# Altium PCB PCBproyecto.PcbDoc
Units mm, origin at the board's own origin, x right, y up, seen from the top; angles counter-clockwise.
Board outline 85 x 75 mm, 2 copper layers (Top Layer, Bottom Layer); 40 components, 30 nets, 126 pads, 1 vias.
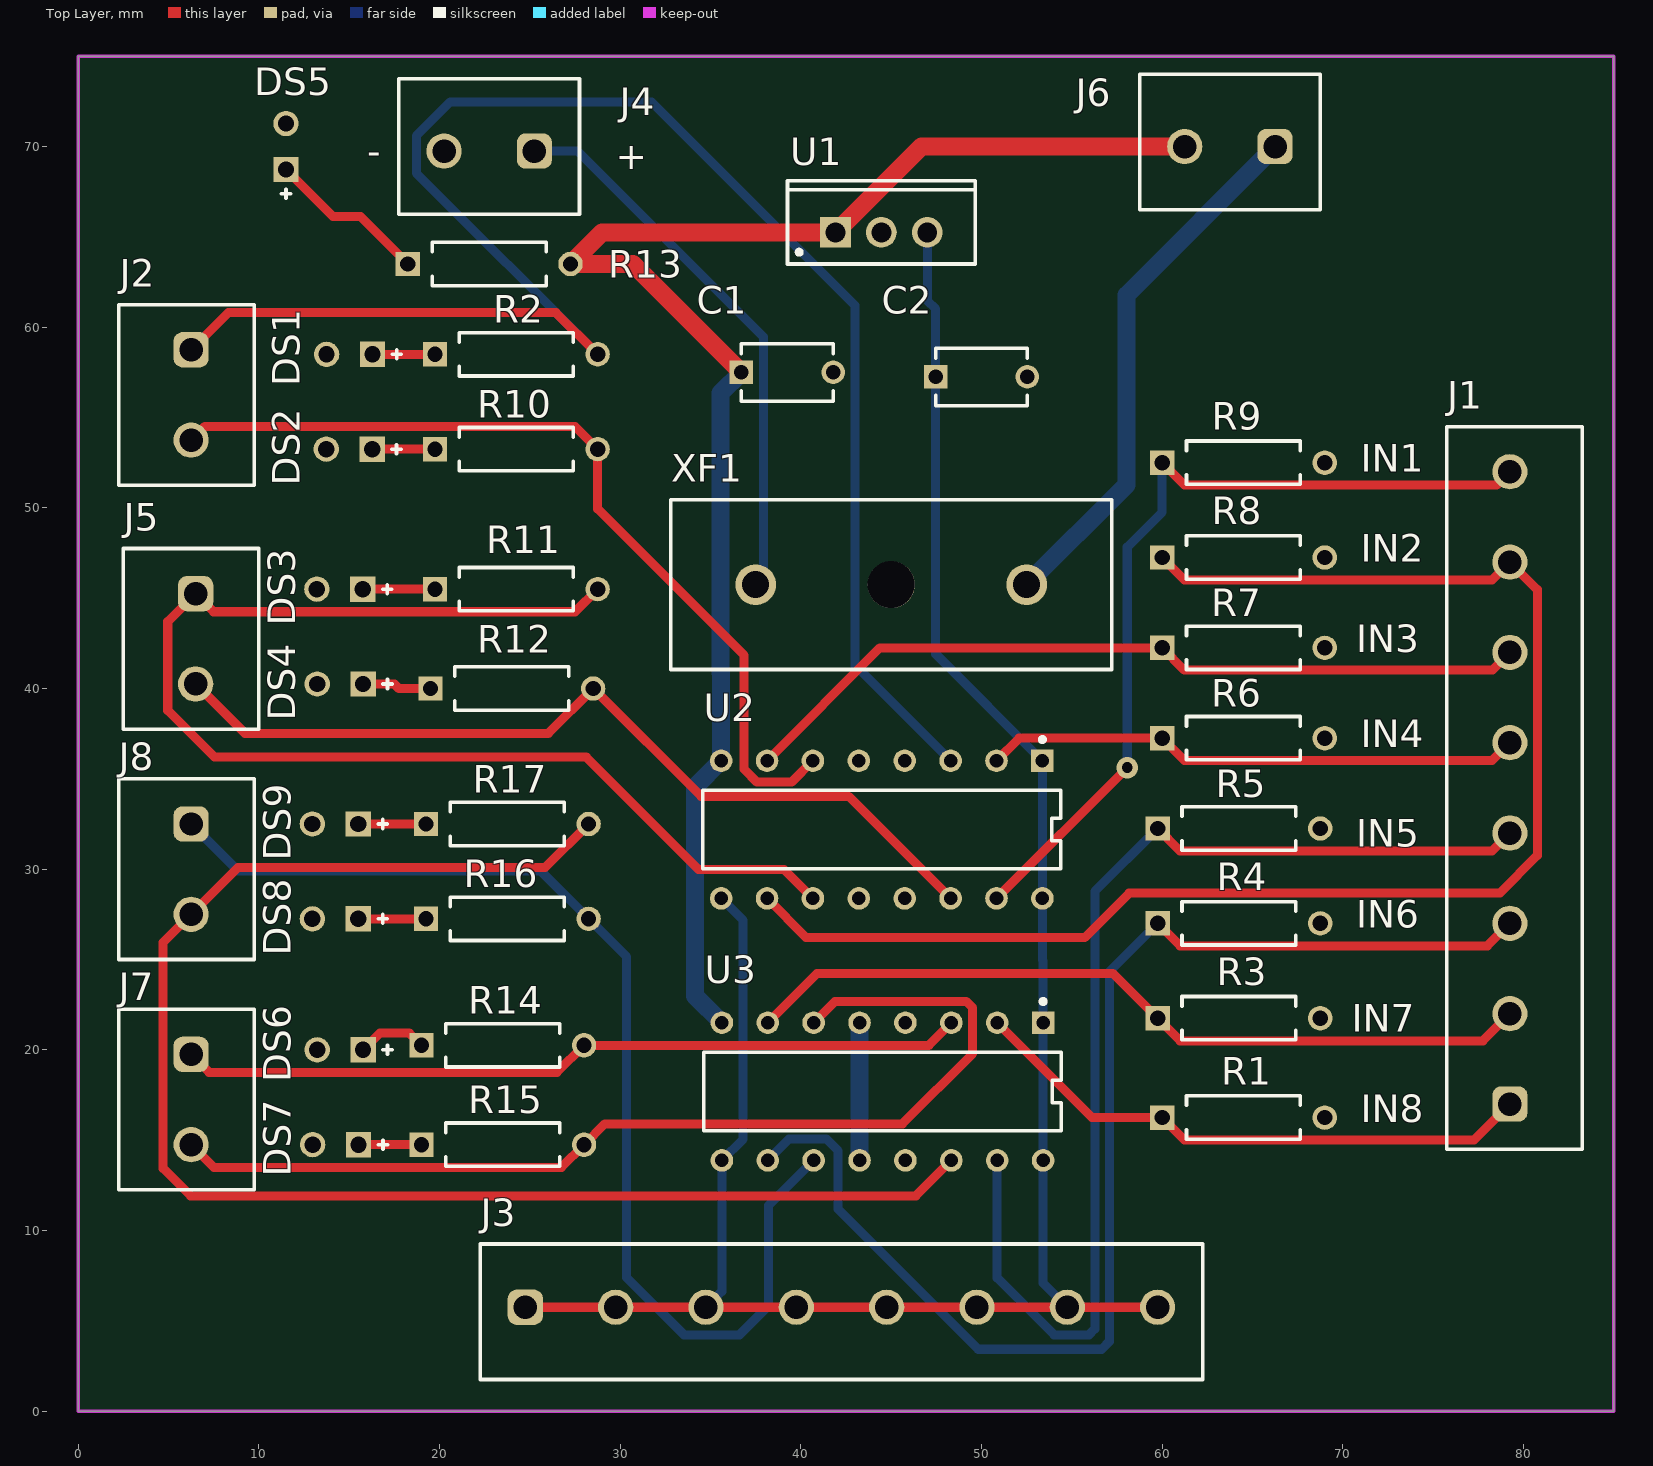
[diagram p0: Top Layer view]
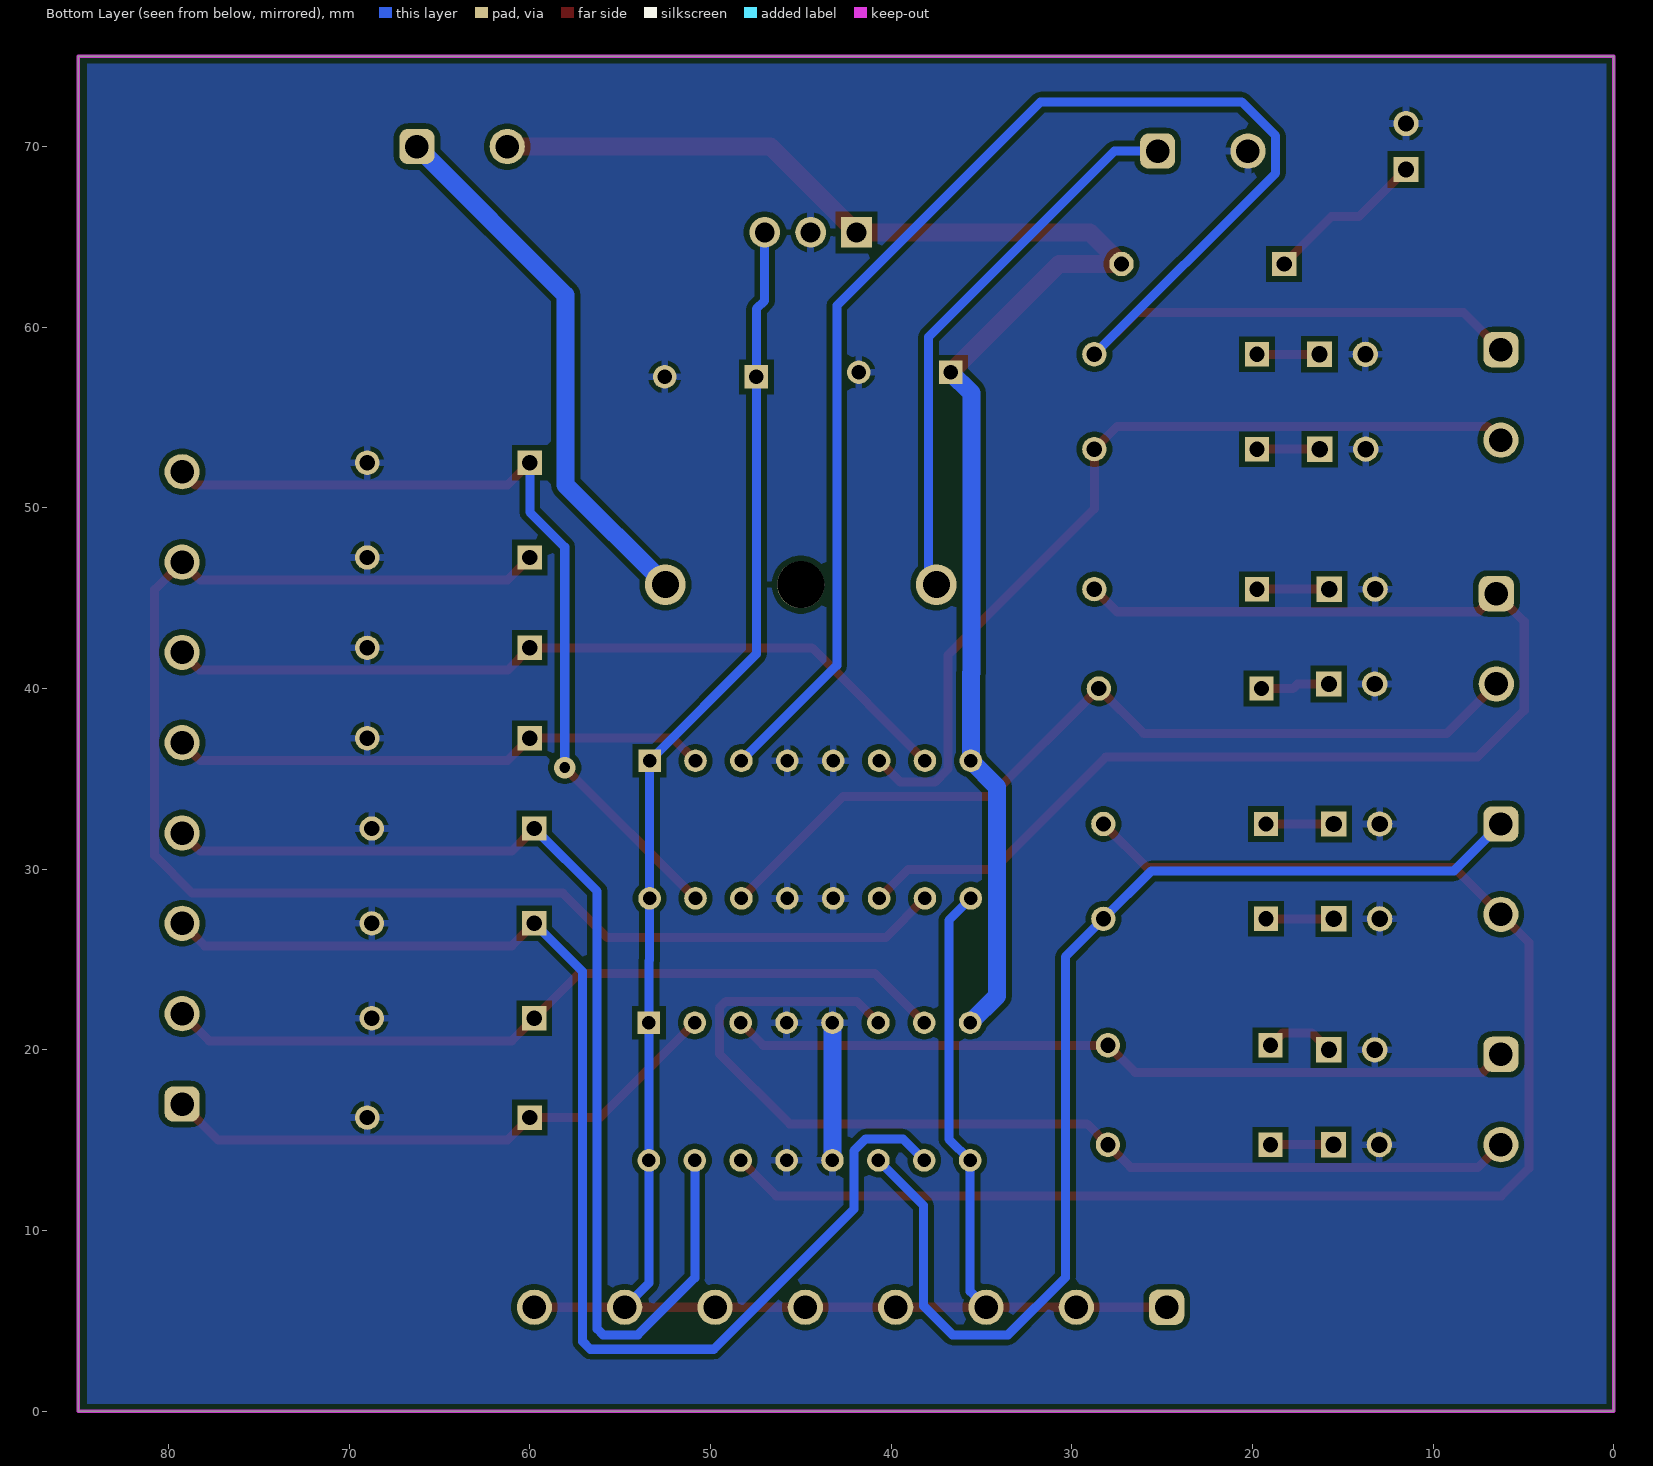
[diagram p1: Bottom Layer view, seen from below]

## Layer stack, top to bottom
Top Solder: solder mask 0.0102, Solder Resist, Dk 3.5
Top Layer: signal copper 0.0356
Dielectric 1: dielectric 0.32, FR-4, Dk 4.8
Bottom Layer: signal copper 0.0356
Bottom Solder: solder mask 0.0102, Solder Resist, Dk 3.5

## Board outline
0,0 0,75 85,75 85,0

## Design rules (kind name [scope] priority, off if disabled: settings)
Clearance [All] p1: gap=0.3 ignorepadtopadclearanceinfootprint=FALSE
HoleSize [All] p1: absolutevalues=TRUE maxlimit=3.5 minlimit=0.06 maxpercent=80.000 minpercent=20.000
PolygonConnect [All] p1: connectstyle=Relief reliefconductorwidth=0.4 reliefentries=4 polygonreliefangle="90 Angle" airgapwidth=0.254
RoutingVias [All] p1: holewidth=0.6 width=1.2 viastyle="Through Hole" minholewidth=0.4 minwidth=1 maxholewidth=0.6 maxwidth=1.2
SolderMaskExpansion [All] p1: expansion=0 istentingtop=FALSE
SupplyNets "Schematic Supply Nets_6" [InNet('+12')] p1: voltage=0.000
SupplyNets "Schematic Supply Nets_5" [InNet('+12V_IN')] p2: voltage=0.000
SupplyNets "Schematic Supply Nets_4" [InNet('+5')] p3: voltage=0.000
SupplyNets "Schematic Supply Nets" [InNet('GND')] p4: voltage=0.000
Width Potencia [InNetClass('Potencia')] p1: maxlimit=2 minlimit=0.8 preferedwidth=1
Width General [All] p2: maxlimit=1 minlimit=0.3 preferedwidth=0.5
Width [All] p3: maxlimit=0.254 minlimit=0.254 preferedwidth=0.254
29 further rules are at their usual default settings.

## Classes and differential pairs
net class Potencia: +12 +12V_IN GND

## Components (designator, comment, footprint, x,y, rotation, side; value= is the part's Value field where it differs from the comment)
C1 "C322C104K5R5TA" FP-C322C104K5R5TA-MFG 39.25,57.5 r0 top
C2 "C322C104K5R5TA" FP-C322C104K5R5TA-MFG 50,57.25 r0 top
DS1 "LTL-1CHG" LTST-LTL-1CHG-2 15.02,58.5 r180 top
DS2 "LTL-1CHG" LTST-LTL-1CHG-2 15,53.25 r180 top
DS3 "LTL-1CHG" LTST-LTL-1CHG-2 14.48,45.5 r180 top
DS4 "LTL-1CHG" LTST-LTL-1CHG-2 14.5,40.25 r180 top
DS5 "LTL-1CHG" LTST-LTL-1CHG-2 11.5,70 r90 top
DS6 "LTL-1CHG" LTST-LTL-1CHG-2 14.5,20 r180 top
DS7 "LTL-1CHG" LTST-LTL-1CHG-2 14.25,14.75 r180 top
DS8 "LTL-1CHG" LTST-LTL-1CHG-2 14.23,27.25 r180 top
DS9 "LTL-1CHG" LTST-LTL-1CHG-2 14.23,32.5 r180 top
J1 "691137710008" 691137710008 79.5,34.5 r90 top
J2 "691137710002" 691137710002 6,56.25 r270 top
J3 "691137710008" 691137710008 42.25,5.5 r0 top
J4 "691137710002" 691137710002 22.75,70 r180 top
J5 "691137710002" 691137710002 6.25,42.75 r270 top
J6 "691137710002" 691137710002 63.75,70.25 r180 top
J7 "691137710002" 691137710002 6,17.25 r270 top
J8 "691137710002" 691137710002 6,30 r270 top
R1 "MFR-25FBF52-100K" RESA60-630X240 64.5,16.25 r0 top value=10k
R2 "MFR-25FBF52-100K" RESA60-630X240 24.25,58.5 r0 top value=1k
R3 "MFR-25FBF52-100K" RESA60-630X240 64.25,21.75 r0 top value=10k
R4 "MFR-25FBF52-100K" RESA60-630X240 64.25,27 r0 top value=10k
R5 "MFR-25FBF52-100K" RESA60-630X240 64.25,32.25 r0 top value=10k
R6 "MFR-25FBF52-100K" RESA60-630X240 64.5,37.25 r0 top value=10k
R7 "MFR-25FBF52-100K" RESA60-630X240 64.5,42.25 r0 top value=10k
R8 "MFR-25FBF52-100K" RESA60-630X240 64.5,47.25 r0 top value=10k
R9 "MFR-25FBF52-100K" RESA60-630X240 64.5,52.5 r0 top value=10k
R10 "MFR-25FBF52-100K" RESA60-630X240 24.25,53.25 r0 top value=1k
R11 "MFR-25FBF52-100K" RESA60-630X240 24.25,45.5 r0 top value=1k
R12 "MFR-25FBF52-100K" RESA60-630X240 24,40 r0 top value=1k
R13 "MFR-25FBF52-100K" RESA60-630X240 22.75,63.5 r0 top value=1k
R14 "MFR-25FBF52-100K" RESA60-630X240 23.5,20.25 r0 top value=1k
R15 "MFR-25FBF52-100K" RESA60-630X240 23.5,14.75 r0 top value=1k
R16 "MFR-25FBF52-100K" RESA60-630X240 23.75,27.25 r0 top value=1k
R17 "MFR-25FBF52-100K" RESA60-630X240 23.75,32.5 r0 top value=1k
U1 "L7805CV" TO220 44.46,65.25 r0 top
U2 "L293DNE" FP-NE0016A-MFG 44.48,32.19 r270 top
U3 "L293DNE" FP-NE0016A-MFG 44.52,17.69 r270 top
XF1 "696105003002" 696105003002 45,45.75 r0 top

## Footprints (in the part's own frame and the unit in brackets; to place one, negate y for a bottom-side part, rotate by r counter-clockwise, add the part's x,y. Pads: shape width x height; smd on the part's side, far side on the other; paste and mask are expansions set on the pad)
691137710002 [mm] "Horizontal Cable Entry with Pressure Clamp, pitch 5mm, 02p"
  rrect50% 1.95x1.95 hole 1.3: 1(-2.5,0.25)
  round 1.95 hole 1.3: 2(2.5,0.25)
  silkscreen extent -5,-3.75 5,3.75, body extent -5,-3.75 5,3.75, height 11.6
691137710008 [mm] "Horizontal Cable Entry with Pressure Clamp, pitch 5mm, 08p"
  rrect50% 1.95x1.95 hole 1.3: 1(-17.5,0.25)
  round 1.95 hole 1.3: 2(-12.5,0.25) 3(-7.5,0.25) 4(-2.5,0.25) 5(2.5,0.25) 6(7.5,0.25) 7(12.5,0.25) 8(17.5,0.25)
  silkscreen extent -20,-3.75 20,3.75, body extent -20,-3.75 20,3.75, height 11.6
696105003002 [mm] "FUSEHOLDER BLOCKS - PCB - CLIP COVER - THT"
  round 2.25 hole 1.5: 1(-7.5,0) 2(7.5,0)
  round 2.6 hole 2.6 unplated: MH1(0,0)
  silkscreen extent -12.2,-4.7 12.2,4.7, body extent -12.2,-4.7 12.2,4.7, height 11.55
FP-C322C104K5R5TA-MFG [mm]
  rect 1.3x1.3 hole 0.8 paste-2539.97 mask+0: 1(-2.54,0)
  round 1.3 hole 0.8 paste-2539.97 mask+0: 2(2.54,0)
  silkscreen extent -2.54,-1.59 2.54,1.59, body extent -3.29,-1.69 3.29,1.69, height 0.25
FP-NE0016A-MFG [mm]
  rect 1.25x1.25 hole 0.75 paste-2539.97 mask+0: 1(-3.81,8.89)
  round 1.25 hole 0.75 paste-2539.97 mask+0: 2(-3.81,6.35) 3(-3.81,3.81) 4(-3.81,1.27) 5(-3.81,-1.27) 6(-3.81,-3.81) 7(-3.81,-6.35) 8(-3.81,-8.89) 9(3.81,-8.89) 10(3.81,-6.35) 11(3.81,-3.81) 12(3.81,-1.27) 13(3.81,1.27) 14(3.81,3.81) 15(3.81,6.35) 16(3.81,8.89)
  silkscreen extent -5.11,-9.9 2.18,9.9
LTST-LTL-1CHG-2 [mm] "TH, 2-Leads, Dia 3.8mm"
  rect 1.4x1.4 hole 0.9: 1(-1.27,0)
  round 1.4 hole 0.9: 2(1.27,0)
  silkscreen extent -2.87,-0.25 -2.37,0.25, body extent -1.9,-1.9 1.9,1.9, height 6.5
RESA60-630X240 [mm] "Axial Resistor, 2-Leads, Dia 2.4mm, Body Length 6.3mm"
  rect 1.35x1.35 hole 0.85: 1(-4.5,0)
  round 1.35 hole 0.85: 2(4.5,0)
  silkscreen extent -3.15,-1.2 3.15,1.2, body extent -4.78,-1.2 4.78,1.2, height 2.4
TO220 [mm] "TO, Thru-Hole, Vertical, Heatsink Mounted; 3 In-Line Leads; Pitch 2.54 mm"
  rect 1.7x1.7 hole 1.1: 1(-2.54,0)
  round 1.7 hole 1.1: 2(0,0) 3(2.54,0)
  silkscreen extent -5.2,-1.75 5.2,2.85, body extent -5.25,-1.8 5.25,2.9, height 19.7

## Part data
C1 C2: library part CMP-03020-034661-1, "CAP CER 0.1UF 50V X7R RADIAL", Capacitance=100nF, Case/Package=Radial, Dielectric=X7R, Dielectric Material=Ceramic, Max Operating Temperature=125°C, Min Operating Temperature=-55°C, Package Quantity=500, Tolerance=10%, Voltage=50V, Construction=RADIAL, Depth=3.18mm, Dissipation Factor=2.5%, Height=3.18mm, Height - Seated (Max)=0.26inch, Lead Diameter=0.51mm, Lead Free="Lead Free", Lead Length=7mm, Lead Pitch=5.08mm, Lead/Base Style="Formed Leads", Length=5.08mm, Material=Ceramic, Mount="Through Hole", Number of Pins=2, Packaging=Bulk, Radiation Hardening=No, REACH SVHC="No SVHC", RoHS Compliant=Yes, Series="Golden Max™", Termination=Radial, Voltage Rating=50V, Voltage Rating (DC)=50V, Weight=0.0625lb, Width=0.125inch
DS1 DS2 DS3 DS4 DS5 DS6 DS7 DS8 DS9: library part CMP-007-00019-2, "LED Uni-Color Green, 100 mW, 30 mA, -55 to 100 degC, 2-Pin THD, RoHS, Bulk", Case/Package=Radial, Colour=Green, Forward Current=30mA, Forward Voltage=2.6V, Manufacturer=Lite-On, Max Operating Temperature=100°C, Min Operating Temperature=-55°C, Package Description="2-Pin Through Hole Device, Dia 3.8 mm", Package Quantity=1000, Power=100mW, Datasheet URL=http://datasheet.octopart.com/LTL-1CHG-Lite-On-datasheet-143841.pdf, Datasheet Version=Mar-00, Illumination Colour=Green, Lens Style=Dome, Luminous Intensity=12.6mcd, Manufacturer URL=http://www.us.liteon.com/, Mounting Technology=TH, Nominal Vf=2.1V, Package Reference=LTL-1CHG, Packaging=Bulk, Pins=2, RoHS Compliant=True, Viewing Angle=60degrees
J1 J3: library part CMP-1502-03330-3, "Terminal Block, 5MM Pitch, Horizontal, Pressure Clamp Glow Wire, Pcb, 8PINS, Gr", Current Rating=16A, Max Operating Temperature=110°C, Min Operating Temperature=-30°C, Voltage Rating=300V, Contact Material=Tin, Height=11.6mm, Lead Pitch=5mm, Number of Contacts=8, Number of Pins=8, Number of Rows=1, Packaging=Box, RoHS=Compliant
J2 J4 J5 J6 J7 J8: library part CMP-1502-03324-3, "Terminal Block, 5MM Pitch, Horizontal, Pressure Clamp Glow Wire, Pcb, 2PINS, Gr", Current Rating=16A, Max Operating Temperature=120°C, Min Operating Temperature=-30°C, Voltage Rating=300V, Contact Material="Nickel, Tin", Height=11.6mm, Lead Pitch=5mm, Number of Contacts=2, Number of Pins=2, Number of Rows=1, Packaging=Box, RoHS=Compliant
R1 R2 R3 R4 R5 R6 R7 R8 R9 R10 R11 R12 R13 R14 R15 R16 R17: library part CMP-009-00045-4, "Axial Resistor, 100 KOhm, +/- 1%, 0.25 W, -55 to 155 degC, 2-Pin THD, RoHS, Bulk", Case/Package=Axial, Manufacturer=Yageo, Max Operating Temperature=155°C, Min Operating Temperature=-55°C, Package Description="2-Pin Axial Lead, Dia 2.4 mm, Body Length 6.3 mm", Package Quantity=200, Package Reference=MFR-25, Power=250mW, Tolerance=1%, Voltage Rating=250V, Datasheet URL=http://www.yageo.com/documents/recent/Yageo%20LR_MFR_2013.pdf, Datasheet Version=Apr-13, Manufacturer URL=http://www.yageo.com/, Mounting Technology=TH, Packaging=Bulk, RoHS Compliant=True
U1: library part CMP-0244-00483-1, "Positive Voltage Regulator, 5V, 3-Pin TO-220", ComponentLink1Description="Manufacturer URL", ComponentLink1URL=http://www.st.com, ComponentLink2Description=Datasheet, ComponentLink2URL=http://www.st.com/internet/com/TECHNICAL_RESOURCES/TECHNICAL_LITERATURE/DATASHEET/CD00000444.pdf, ComponentLink3Description="Package Specification", ComponentLink3URL=http://www.st.com/internet/com/TECHNICAL_RESOURCES/TECHNICAL_LITERATURE/PACKAGE_INFORMATION/CD00004649.pdf, DatasheetVersion=16/11/2011, PackageDescription="TO, Thru-Hole, Vertical, Heatsink Mounted; 3 In-Line Leads; Pitch 2.54 mm", PackageReference=TO220, PackageVersion=ver3.0
U2 U3: library part CMP-1685-00015-2, "IC MTR DRV BIPOLAR 4.5-36V 16DIP", Case/Package=PDIP, Max Operating Temperature=70°C, Max Supply Voltage=36V, Min Operating Temperature=0°C, Min Supply Voltage=4.5V, Operating Supply Current=24mA, Output Current=600mA, Package Quantity=25, Height=4.57mm, Interface=Parallel, Lead Free="Lead Free", Length=19.8mm, Logic Function="AND GATE", Mount="Through Hole", Number of Drivers=4, Number Of Outputs=4, Number of Pins=16, Output Voltage=36V, Packaging=Rail/Tube, Radiation Hardening=No, REACH SVHC="No SVHC", Weight=0.03357oz, Width=6.35mm
XF1: library part CMP-1502-00234-3, "WR-FSH Fuse Holder Blocks Fuse Holder Blocks Clip Cover for PCB", Fuse Current=10A, Voltage Rating (AC)=250V, Mount="Through Hole", Packaging=Box, REACH SVHC=Unknown

## Free pads (board coordinates)
  round 6 on Mech1: ""(4,4) ""(4,71) ""(81,4) ""(81,71)

## Via types
v1: diameter 1.2, hole 0.6, Top Layer to Bottom Layer, 1 vias

## Nets (pads, with @x,y where several pads share a name; then routed paths per layer and width w, separated by ;. In a path a pad name is that pad's centre, name@x,y a point inside that pad or via, vN(x,y) a via of type N, cw(c..) or ccw(c..) an arc to the next point about the centre after c; other vN are vias at no path point)
+5: C2.1 J3.1 J3.2 J3.3 J3.4 J3.5 J3.6 J3.7 J3.8 U1.3 U2.1 U2.9 U2.16 U3.1 U3.9 U3.16 | length 121.7
  Top Layer w0.5: J3.1 J3.2 J3.3 J3.4 J3.5 J3.6 J3.7 J3.8
  Bottom Layer w0.5: J3.3 35.63,6.63 U3.9 36.809,15.059 36.809,27.161 U2.9 ; U1.3 47,61.473 47.46,61.013 C2.1 47.46,41.91 U2.1 U2.16 53.37,24.96 53.41,24.92 U3.1 U3.16 53.41,7.09 J3.7
+12: C1.1 J6.2 R13.2 U1.1 U2.8 U3.8 | length 86.3
  Top Layer w1: C1.1 30.71,63.5 R13.2 29,65.25 U1.1 46.67,70 J6.2
  Bottom Layer w1: U3.8 34.142,22.988 34.142,34.552 U2.8 35.59,40.846 35.564,40.872 35.564,56.354 C1.1
+12V_IN: J6.1 XF1.2 | length 29.9
  Bottom Layer w1: XF1.2 58.018,51.268 58.018,61.768 J6.1
GND: C1.2 C2.2 DS1.2 DS2.2 DS3.2 DS4.2 DS5.2 DS6.2 DS7.2 DS8.2 DS9.2 J4.2 R1.2 R3.2 R4.2 R5.2 R6.2 R7.2 R8.2 R9.2 U1.2 U2.4 U2.5 U2.12 U2.13 U3.4 U3.5 U3.12 U3.13 | length 7.6
  Bottom Layer w1: U3.12 U3.5
NetDS1_1: DS1.1 R2.1 | length 3.5
  Top Layer w0.5: DS1.1 R2.1
NetDS2_1: DS2.1 R10.1 | length 3.5
  Top Layer w0.5: DS2.1 R10.1
NetDS3_1: DS3.1 R11.1 | length 4
  Top Layer w0.5: DS3.1 R11.1
NetDS4_1: DS4.1 R12.1 | length 3.8
  Top Layer w0.5: DS4.1 17.505,40.25 17.755,40 R12.1
NetDS5_1: DS5.1 R13.1 | length 8.9
  Top Layer w0.5: DS5.1 14.111,66.119 15.631,66.119 R13.1
NetDS6_1: DS6.1 R14.1 | length 3.9
  Top Layer w0.5: DS6.1 16.695,20.925 18.325,20.925 R14.1
NetDS7_1: DS7.1 R15.1 | length 3.5
  Top Layer w0.5: DS7.1 R15.1
NetDS8_1: DS8.1 R16.1 | length 3.8
  Top Layer w0.5: DS8.1 R16.1
NetDS9_1: DS9.1 R17.1 | length 3.8
  Top Layer w0.5: DS9.1 R17.1
NetJ2_1: J2.1 R2.2 U2.3 | length 97.7
  Top Layer w0.5: J2.1 8.31,60.81 26.44,60.81 R2.2
  Bottom Layer w0.5: R2.2 18.724,68.526 18.724,70.589 20.603,72.469 31.729,72.469 43.006,61.191 43.006,41.284 U2.3
NetJ2_2: J2.2 R10.2 U2.6 | length 49
  Top Layer w0.5: J2.2 7.011,54.511 27.489,54.511 R10.2 28.75,49.946 36.86,41.836 36.86,35.537 37.572,34.825 39.495,34.825 U2.6
NetJ4_1: J4.1 XF1.1 | length 31.1
  Bottom Layer w0.5: J4.1 27.64,69.75 37.926,59.464 37.926,45.75 XF1.1
NetJ5_1: J5.1 R11.2 U2.11 | length 70.3
  Top Layer w0.5: R11.2 27.499,44.249 7.501,44.249 J5.1 4.957,43.707 4.957,38.788 7.548,36.197 28.122,36.197 34.345,29.974 39.076,29.974 U2.11
NetJ5_2: J5.2 R12.2 U2.14 | length 48.8
  Top Layer w0.5: J5.2 9.232,37.518 26.018,37.518 R12.2 34.475,34.025 42.645,34.025 U2.14
NetJ7_1: J7.1 R14.2 U3.3 | length 43.6
  Top Layer w0.5: J7.1 7.252,18.748 26.498,18.748 R14.2 47.08,20.25 U3.3
NetJ7_2: J7.2 R15.2 U3.6 | length 58.4
  Top Layer w0.5: J7.2 7.51,13.49 26.74,13.49 R15.2 29.153,15.903 45.622,15.903 49.509,19.789 49.509,22.329 49.153,22.685 41.895,22.685 U3.6
NetJ8_1: J8.1 R16.2 U3.11 | length 63.8
  Bottom Layer w0.5: J8.1 8.852,29.898 25.602,29.898 R16.2 30.357,25.143 30.357,7.394 33.532,4.219 36.605,4.219 38.206,5.819 38.206,11.376 U3.11
NetJ8_2: J8.2 R17.2 U3.14 | length 83.8
  Top Layer w0.5: R17.2 25.851,30.101 8.851,30.101 J8.2 4.703,25.953 4.703,13.439 6.227,11.915 46.365,11.915 U3.14
U1_IN1: J1.1 R1.1 U3.2 | length 31.9
  Top Layer w0.5: U3.2 56.12,16.25 R1.1 61.236,15.014 77.264,15.014 J1.1
U1_IN2: J1.2 R3.1 U3.7 | length 44.4
  Top Layer w0.5: U3.7 40.904,24.234 57.266,24.234 R3.1 61,20.5 77.75,20.5 J1.2
U1_IN3: J1.3 R4.1 U3.10 | length 71.1
  Top Layer w0.5: R4.1 60.992,25.758 78.008,25.758 J1.3
  Bottom Layer w0.5: U3.10 39.355,15.065 41.406,15.065 42.066,14.404 42.066,11.178 49.82,3.425 56.646,3.425 57.075,3.854 57.075,24.325 R4.1
U1_IN4: J1.4 R5.1 U3.15 | length 62.9
  Top Layer w0.5: R5.1 60.984,31.016 78.266,31.016 J1.4
  Bottom Layer w0.5: U3.15 50.87,7.379 54.024,4.225 55.951,4.225 56.275,4.549 56.275,28.775 R5.1
U2_IN1: J1.5 R6.1 U2.2 | length 29.9
  Top Layer w0.5: U2.2 52.08,37.25 R6.1 61.23,36.02 78.27,36.02 J1.5
U2_IN2: J1.6 R7.1 U2.7 | length 44.6
  Top Layer w0.5: U2.7 44.38,42.25 R7.1 61.227,41.023 78.273,41.023 J1.6
U2_IN3: J1.7 R8.1 U2.10 | length 82.5
  Top Layer w0.5: U2.10 40.295,26.215 55.706,26.215 58.17,28.679 78.693,28.679 80.776,30.762 80.776,45.474 J1.7 78.252,46.002 61.248,46.002 R8.1
U2_IN4: J1.8 R9.1 U2.15 | length 48
  Top Layer w0.5: U2.15 v1(58.068,35.618) ; R9.1 61.24,51.26 78.51,51.26 J1.8
  Bottom Layer w0.5: v1(58.068,35.618) 58.068,47.831 60,49.762 R9.1
pads on no net: XF1.MH1

## Polygon pours and split planes (outlines as drawn)
GND on Bottom Layer "GND_L02_P000" (solid, remove dead copper, pour order 0): 0.25,74.75 84.5,74.75 84.5,0.25 0.25,0.25

## Keep-outs
Keep-Out Layer:
  the board outline again, w0.2

## Silkscreen, mask and mechanical layers (free items; w line width, h text height)
Top Overlay:
  text "-" at 16.004,68.992 h1.52
  text "+" at 29.754,68.75 h1.52
  text "IN1" at 71.004,52.004 h1.52
  text "IN2" at 71.004,47.004 h1.52
  text "IN3" at 70.754,42.004 h1.52
  text "IN4" at 71.004,36.754 h1.52
  text "IN5" at 70.754,31.254 h1.52
  text "IN6" at 70.754,26.754 h1.52
  text "IN7" at 70.504,21.004 h1.52
  text "IN8" at 71.004,16.004 h1.52